# Altium PCB PCB1.PcbDoc (part 1 of 2)
Units mil, origin at the board's own origin, x right, y up, seen from the top; angles counter-clockwise.
Board outline 2130 x 2330 mil, 2 copper layers (Top Layer, Bottom Layer); 110 components, 79 nets, 324 pads, 362 vias.
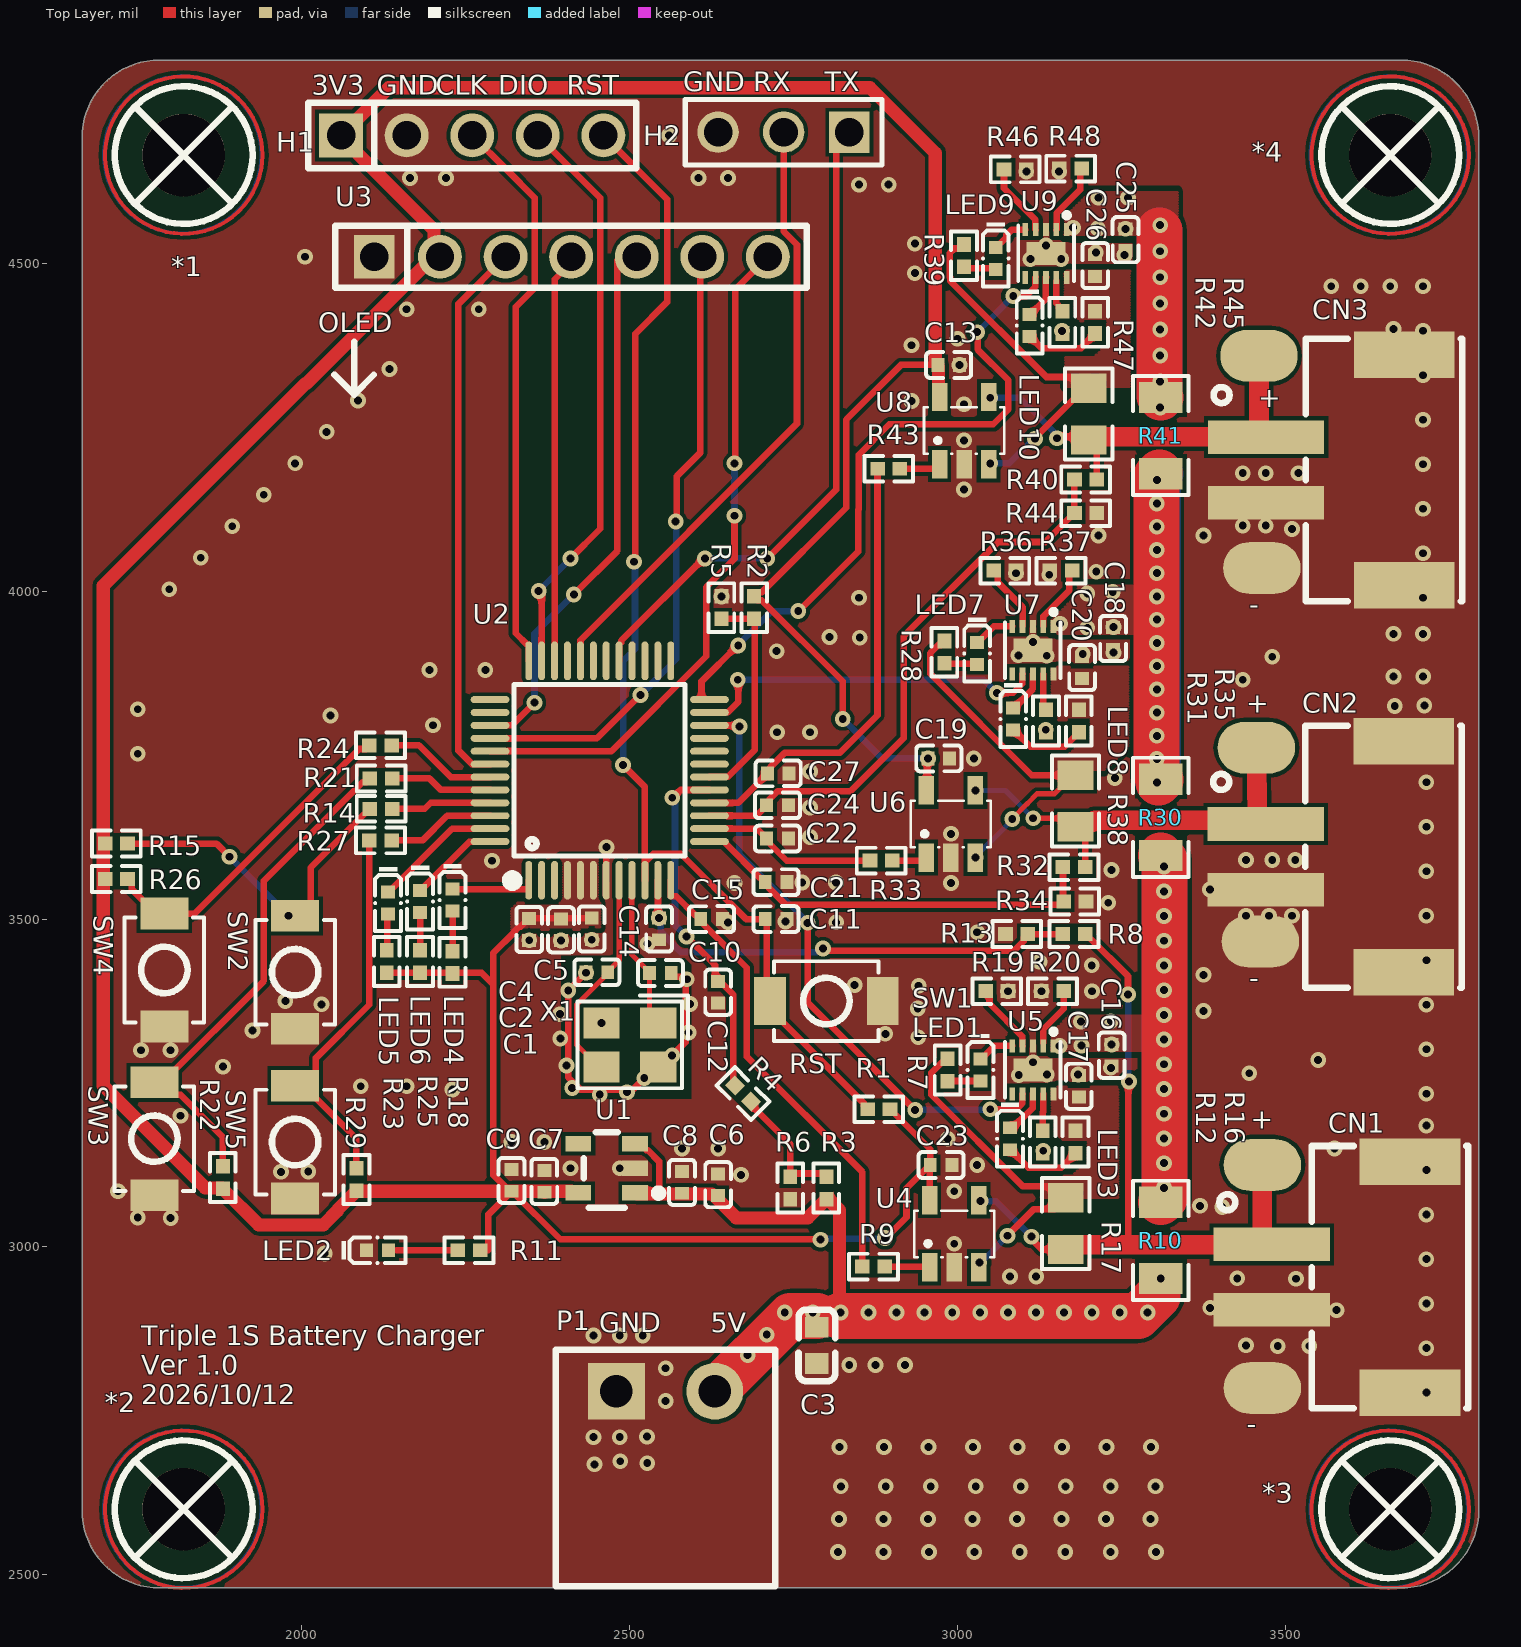
[diagram p0: Top Layer view]
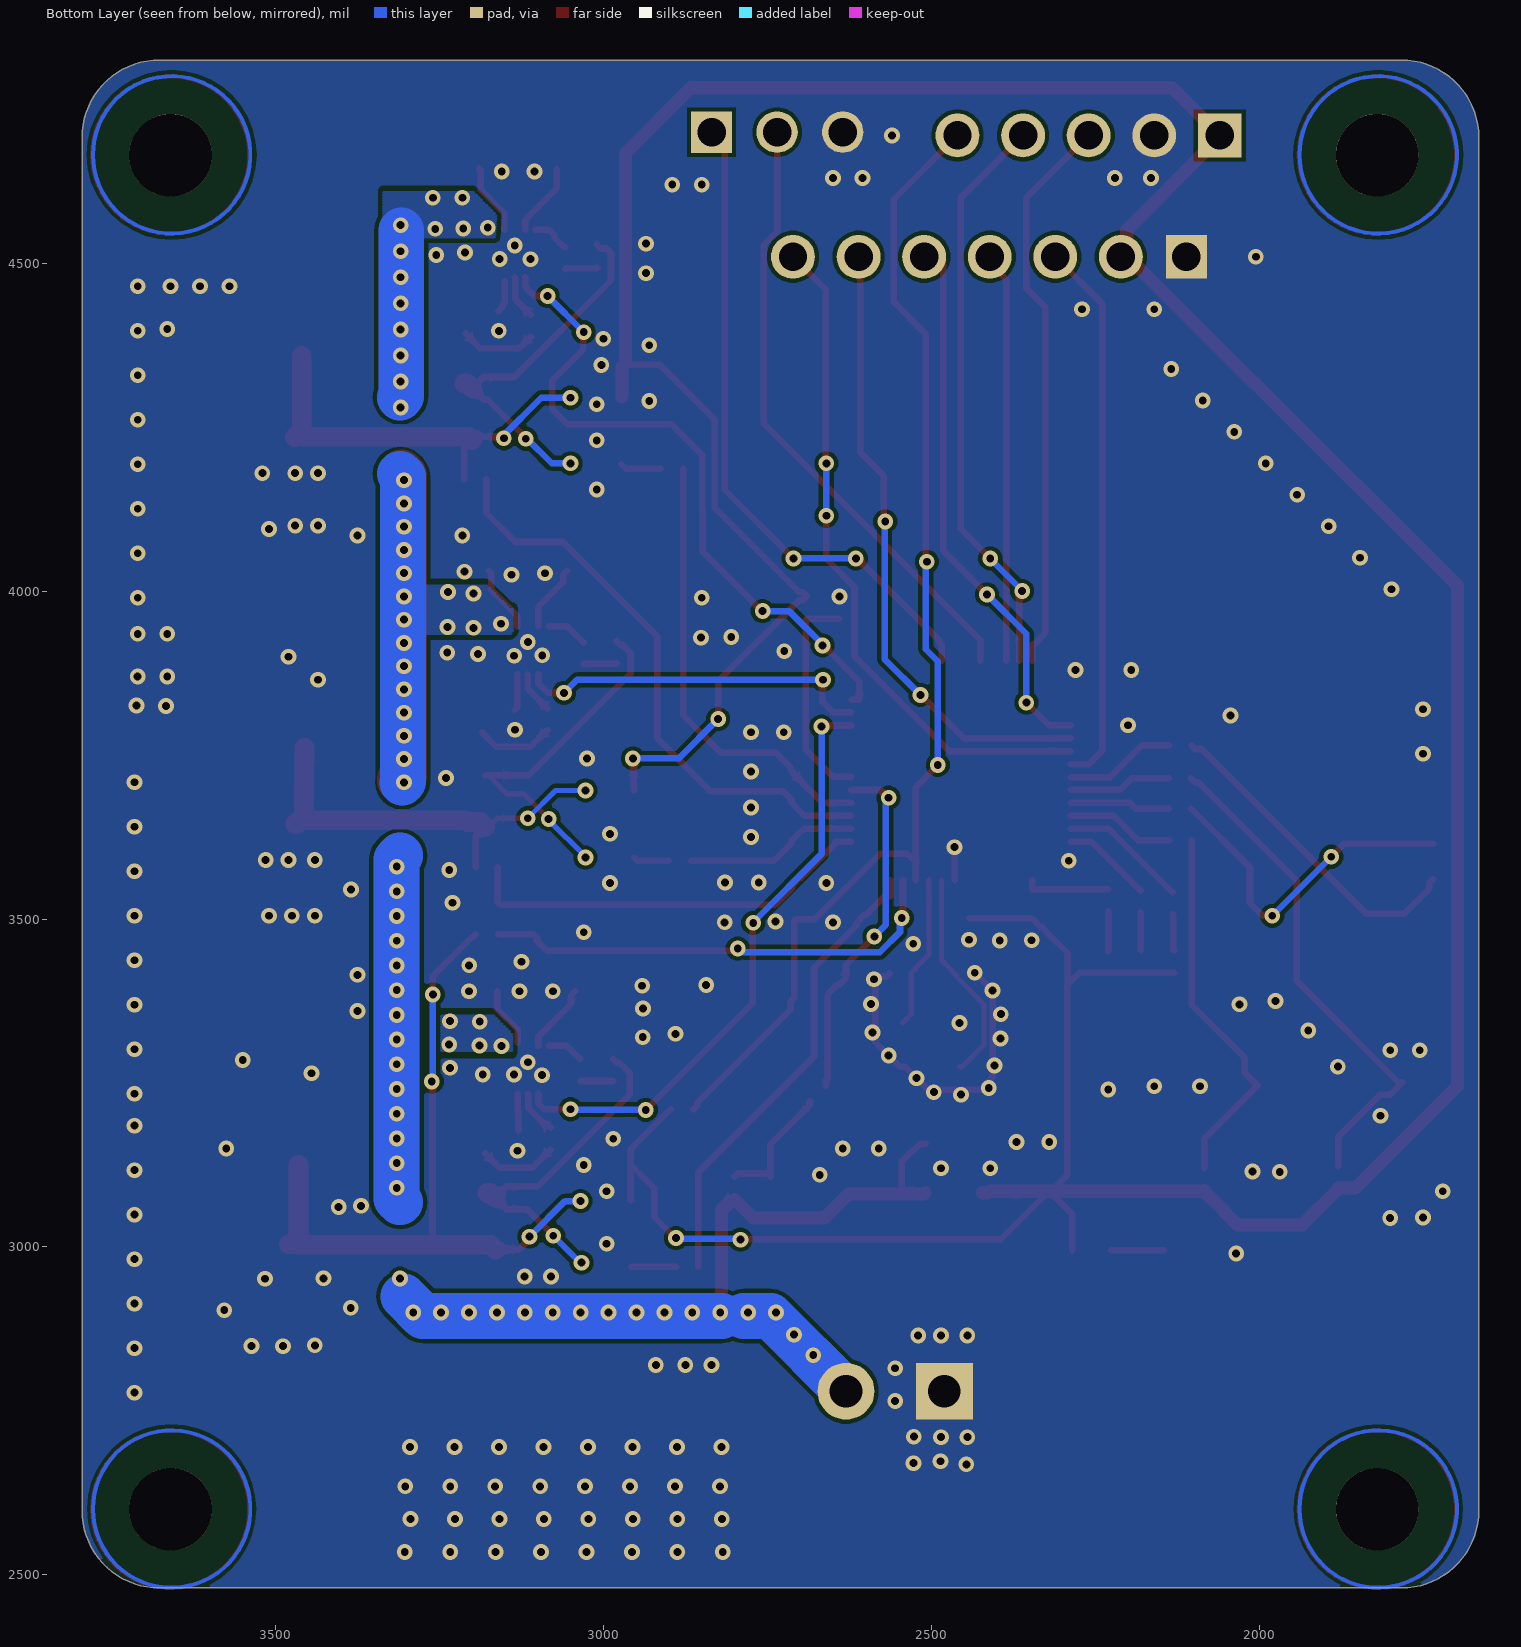
[diagram p1: Bottom Layer view, seen from below]

## Layer stack, top to bottom
Top Solder: solder mask 0.4, Solder Resist, Dk 3.5
Top Layer: signal copper 1.4
Dielectric 1: dielectric 12.6, FR-4, Dk 4.8
Bottom Layer: signal copper 1.4
Bottom Solder: solder mask 0.4, Solder Resist, Dk 3.5

## Board outline
1665,2598.11 1665,4691.89 cw(c1783.11,4691.89) 1783.11,4810 3676.89,4810 cw(c3676.89,4691.89) 3795,4691.89 3795,2598.11 cw(c3676.89,2598.11) 3676.89,2480 1783.11,2480 cw(c1783.11,2598.11)

## Design rules (kind name [scope] priority, off if disabled: settings)
Clearance [All] p1: gap=6 ignorepadtopadclearanceinfootprint=FALSE except(4: Arc-Arc Arc-Track Track-Track; 6.9: Arc-Hole Track-Hole SMDPad-Hole THPad-Hole Via-Hole Fill-Hole Poly-Hole Region-Hole Text-Hole; 10: Fill-Text Poly-Text Region-Text)
ComponentClearance [All] p1: gap=0 collisioncheckmode=3 verticalgap=0 showdistances=FALSE
HoleSize [All] p1: absolutevalues=TRUE maxlimit=130 minlimit=1 maxpercent=80.000 minpercent=20.000
MinimumSolderMaskSliver [All] p1: minsoldermaskwidth=4
PlaneConnect [All] p1: planeconnectstyle=Direct reliefexpansion=20 reliefentries=4 reliefconductorwidth=10 reliefairgap=10
PolygonConnect [All] p1: connectstyle=Direct reliefconductorwidth=10 reliefentries=4 polygonreliefangle="90 Angle" airgapwidth=10
RoutingVias [All] p1: holewidth=28 width=50 viastyle="Through Hole" minholewidth=28 minwidth=50 maxholewidth=28 maxwidth=50
SilkToSilkClearance [All] p1: silktosilkclearance=2
SilkToSolderMaskClearance [IsPad] p1: minsilkscreentomaskgap=2 clearancetoexposedcopper=TRUE
SolderMaskExpansion [All] p1: expansion=0 istentingtop=FALSE
SupplyNets "Schematic Supply Nets_12" [InNet('5V_1')] p1: voltage=0.000
SupplyNets "Schematic Supply Nets_11" [InNet('5V_2')] p2: voltage=0.000
SupplyNets "Schematic Supply Nets_2" [InNet('5V_3')] p3: voltage=0.000
SupplyNets "Schematic Supply Nets_9" [InNet('VBAT3')] p4: voltage=0.000
SupplyNets "Schematic Supply Nets_6" [InNet('VBAT2')] p5: voltage=0.000
SupplyNets "Schematic Supply Nets_10" [InNet('VBAT3_H')] p6: voltage=0.000
SupplyNets "Schematic Supply Nets_7" [InNet('VBAT1_H')] p7: voltage=0.000
SupplyNets "Schematic Supply Nets_5" [InNet('VBAT1')] p8: voltage=0.000
SupplyNets "Schematic Supply Nets_4" [InNet('VBAT2_H')] p9: voltage=0.000
SupplyNets "Schematic Supply Nets_1" [InNet('5V')] p10: voltage=0.000
SupplyNets "Schematic Supply Nets" [InNet('3V3')] p11: voltage=0.000
SupplyNets "Schematic Supply Nets_8" [InNet('GND')] p12: voltage=0.000
Width [All] p1: maxlimit=120 minlimit=6 preferedwidth=10 minimp=50.000000 maximp=50.000000 favimp=50.000000
24 further rules are at their usual default settings.

## Components (designator, comment, footprint, x,y, rotation, side; value= is the part's Value field where it differs from the comment)
*1 "螺丝孔_1" M3螺丝 1820,4665 r0 top
*2 "螺丝孔_1" M3螺丝 1820,2600 r0 top
*3 "螺丝孔_1" M3螺丝 3660,2600 r0 top
*4 "螺丝孔_1" M3螺丝 3660,4665 r0 top
C1 "cc0402krx7r7bb104" C0402 2346.91,3484.19 r270 top value=100nF
C2 "cc0402krx7r7bb104" C0402 2395.45,3483.76 r270 top value=100nF
C3 "hgc0603r5226m160nthj" C0603 2785.56,2849.86 r90 top value=22uF
C4 "cc0402krx7r7bb104" C0402 2442.28,3485.04 r270 top value=100nF
C5 "cc0402jrnpo9bn180" C0402 2450.12,3418.96 r180 top value=18pF
C6 "cga0402x5r105k500gt" C0402 2635,3095 r90 top value=1uF
C7 "cc0402krx7r7bb104" C0402 2370,3100 r90 top value=100nF
C8 "cc0402krx7r7bb104" C0402 2580,3098.46 r90 top value=100nF
C9 "cga0402x5r105k500gt" C0402 2320,3101.54 r90 top value=1uF
C10 "cc0402jrnpo9bn180" C0402 2546.94,3417.73 r180 top value=18pF
C11 "cc0402krx7r7bb104" C0402 2723.36,3500 r180 top value=100nF
C12 "cc0402krx7r7bb104" C0402 2635,3388.46 r90 top value=100nF
C13 "cc0402krx7r7bb104" C0402 2986.54,4345 r180 top value=100nF
C14 "cc0402krx7r7bb104" C0402 2545,3485 r270 top value=100nF
C15 "cc0402krx7r7bb104" C0402 2625,3500 r0 top value=100nF
C16 "cga0402x5r105k500gt" C0402 3235.15,3292.39 r90 top value=1uF
C17 "cga0402x5r105k500gt" C0402 3185,3245 r270 top value=1uF
C18 "cga0402x5r105k500gt" C0402 3237.26,3927.95 r90 top value=1uF
C19 "cc0402krx7r7bb104" C0402 2971.54,3745 r180 top value=100nF
C20 "cga0402x5r105k500gt" C0402 3190,3883.46 r270 top value=1uF
C21 "cc0402krx7r7bb104" C0402 2723.36,3556.33 r0 top value=100nF
C22 "cc0402krx7r7bb104" C0402 2725.49,3622.82 r0 top value=100nF
C23 "cc0402krx7r7bb104" C0402 2975,3125 r180 top value=100nF
C24 "cc0402krx7r7bb104" C0402 2725.49,3673.63 r0 top value=100nF
C25 "cga0402x5r105k500gt" C0402 3256.34,4536 r90 top value=1uF
C26 "cga0402x5r105k500gt" C0402 3210,4496.54 r270 top value=1uF
C27 "cc0402krx7r7bb104" C0402 2726.58,3722.23 r0 top value=100nF
CN1 "2.54-2a-lt" CONN-SMD_2P-P2.54_XH2.54-2AB 3584.68,2954.02 r270 top
CN2 "2.54-2a-lt" CONN-SMD_2P-P2.54_XH2.54-2AB 3575.32,3595.03 r270 top
CN3 "2.54-2a-lt" CONN-SMD_2P-P2.54_XH2.54-2AB 3575.95,4184.87 r270 top
H1 "pz254v-11-05p" HDR-TH_5P-P2.54-V-M 2260,4695 r0 top
H2 "lail-pz2.54-3p-l" HDR-TH_3P-P2.54-V-M-1 2735,4700 r180 top
LED1 "xl-1005ugc_c965793" LED0402-RD_GREEN 3035,3270 r270 top
LED2 "xl-1005ugc_c965793" LED0402-RD_GREEN 2115.51,2994.99 r0 top
LED3 "xl-1005ugc_c965793" LED0402-RD_GREEN 3080,3165 r270 top
LED4 "xl-1005ugc_c965793" LED0402-RD_GREEN 2230,3528.91 r270 top
LED5 "xl-1005ugc_c965793" LED0402-RD_GREEN 2131.7,3524.28 r270 top
LED6 "xl-1005ugc_c965793" LED0402-RD_GREEN 2180.51,3526.83 r270 top
LED7 "xl-1005ugc_c965793" LED0402-RD_GREEN 3030,3905 r270 top
LED8 "xl-1005ugc_c965793" LED0402-RD_GREEN 3085,3805 r270 top
LED9 "xl-1005ugc_c965793" LED0402-RD_GREEN 3058.4,4507.47 r270 top
LED10 "xl-1005ugc_c965793" LED0402-RD_GREEN 3110,4405 r270 top
P1 "wj15edgrc-3.81-02p-14-00a" CONN-TH_2P-P3.81_WJ15EDGRC-3.81-2P 2555,2780 r0 top
R1 "frc0402f1002ts" R0402 2880,3210 r0 top value=10kΩ
R2 "frc0402f1002ts" R0402 2690,3975 r270 top value=10kΩ
R3 "frc0402f1003ts" R0402 2800,3090 r90 top value=100kΩ
R4 "frc0402j102 ts" R0402 2672.88,3233.98 r135 top value=1kΩ
R5 "ncp15xh103f03rc" R0402 2640,3975 r270 top
R6 "0402wgf4702tce" R0402 2745,3090 r90 top value=47kΩ
R7 "frc0402f1501ts" R0402 2985,3270 r90 top value=1.5kΩ
R8 "0402wgf4702tce" R0402 3177.55,3477.15 r180 top value=47kΩ
R9 "frc0402j102 ts" R0402 2872.04,2970 r180 top value=1kΩ
R10 "re1206f1r000" R1206 3310,3010 r270 top value=0Ω
R11 "frc0402j102 ts" R0402 2255,2995 r0 top value=1kΩ
R12 "frc0402f1002ts" R0402 3130,3160 r270 top value=10kΩ
R13 "frc0402f1002ts" R0402 3090.32,3477.15 r180 top value=10kΩ
R14 "0402wgf4700tce" R0402 2121.06,3668.18 r0 top value=470Ω
R15 "rc0402fr-074k7l" R0402 1717.33,3615.14 r0 top value=4.7kΩ
R16 "frc0402f1501ts" R0402 3180,3160 r90 top value=1.5kΩ
R17 "re0805far030" R0805 3165,3035.63 r270 top value=30mΩ
R18 "frc0402j102 ts" R0402 2230,3434.03 r270 top value=1kΩ
R19 "frc0402f2001ts" R0402 3060,3390 r180 top value=2kΩ
R20 "frc0402f5600ts" R0402 3145,3390 r0 top value=560Ω
R21 "0402wgf4700tce" R0402 2121.06,3714.5 r0 top value=470Ω
R22 "rc0402fr-074k7l" R0402 1879.63,3105.92 r90 top value=4.7kΩ
R23 "frc0402j102 ts" R0402 2129.65,3435.23 r270 top value=1kΩ
R24 "0402wgf4700tce" R0402 2120,3765 r0 top value=470Ω
R25 "frc0402j102 ts" R0402 2180.51,3435.23 r270 top value=1kΩ
R26 "rc0402fr-074k7l" R0402 1717.33,3561 r0 top value=4.7kΩ
R27 "0402wgf4700tce" R0402 2120,3620 r0 top value=470Ω
R28 "frc0402f1501ts" R0402 2980,3907.04 r90 top value=1.5kΩ
R29 "rc0402fr-074k7l" R0402 2083.42,3102.77 r90 top value=4.7kΩ
R30 "re1206f1r000" R1206 3310,3655 r270 top value=0Ω
R31 "frc0402f1002ts" R0402 3135,3802.04 r270 top value=10kΩ
R32 "0402wgf4702tce" R0402 3177.55,3579.11 r180 top value=47kΩ
R33 "frc0402j102 ts" R0402 2883.59,3589.12 r180 top value=1kΩ
R34 "frc0402f1002ts" R0402 3178.93,3526.83 r0 top value=10kΩ
R35 "frc0402f1501ts" R0402 3185,3802.04 r90 top value=1.5kΩ
R36 "frc0402f2001ts" R0402 3072.23,4031.28 r180 top value=2kΩ
R37 "frc0402f5600ts" R0402 3157.84,4031.28 r0 top value=560Ω
R38 "re0805far030" R0805 3180,3680 r270 top value=30mΩ
R39 "frc0402f1501ts" R0402 3010,4511.66 r90 top value=1.5kΩ
R40 "0402wgf4702tce" R0402 3195.41,4170.41 r180 top value=47kΩ
R41 "re1206f1r000" R1206 3310,4237.4 r270 top value=0Ω
R42 "frc0402f1002ts" R0402 3160,4410 r270 top value=10kΩ
R43 "frc0402j102 ts" R0402 2895.2,4186.76 r180 top value=1kΩ
R44 "frc0402f1002ts" R0402 3195.41,4119.02 r0 top value=10kΩ
R45 "frc0402f1501ts" R0402 3210,4410 r90 top value=1.5kΩ
R46 "frc0402f2001ts" R0402 3087.94,4643.25 r180 top value=2kΩ
R47 "re0805far030" R0805 3200,4270 r270 top value=30mΩ
R48 "frc0402f5600ts" R0402 3172.5,4644.45 r0 top value=560Ω
SW1 "ts-1088-ar02016" SW-SMD_L3.9-W3.0-P4.45 2800,3375 r180 top
SW2 "ts-1088-ar02016" SW-SMD_L3.9-W3.0-P4.45 1990,3418.96 r90 top
SW3 "ts-1088-ar02016" SW-SMD_L3.9-W3.0-P4.45 1775.37,3165.06 r90 top
SW4 "ts-1088-ar02016" SW-SMD_L3.9-W3.0-P4.45 1790.57,3422.39 r90 top
SW5 "ts-1088-ar02016" SW-SMD_L3.9-W3.0-P4.45 1990,3160 r90 top
U1 "tps7a2033pdbvr" SOT-23-5_L2.9-W1.6-P0.95-LS2.8-BR 2465,3120 r0 top
U2 "stm32g031c8t6" LQFP-48_L7.0-W7.0-P0.50-LS9.0-BL 2454.5,3726.46 r0 top
U3 "kh-2.54fh-1x7p-h8.5" HDR-TH_7P-P2.54-V-F 2410.85,4509.95 r0 top
U4 "ina180a3idbvr" SOT-23-5_L3.0-W1.7-P0.95-LS2.8-BR 2995,3020 r270 top
U5 "bq24040dsqr" WSON-10_L2.0-W2.0-P0.40-BL-EP 3115,3270 r180 top
U6 "ina180a3idbvr" SOT-23-5_L3.0-W1.7-P0.95-LS2.8-BR 2990,3645 r270 top
U7 "bq24040dsqr" WSON-10_L2.0-W2.0-P0.40-BL-EP 3115,3910 r180 top
U8 "ina180a3idbvr" SOT-23-5_L3.0-W1.7-P0.95-LS2.8-BR 3010,4245 r270 top
U9 "bq24040dsqr" WSON-10_L2.0-W2.0-P0.40-BL-EP 3135,4515 r180 top
X1 "x32258mob4si" CRYSTAL-SMD_4P-L3.2-W2.5-BL 2500.36,3308.16 r180 top value=8MHz

## Footprints (in the part's own frame and the unit in brackets; to place one, negate y for a bottom-side part, rotate by r counter-clockwise, add the part's x,y. Pads: shape width x height; smd on the part's side, far side on the other; paste and mask are expansions set on the pad)
C0402 [mm]
  rect 0.5x0.54 smd: 1(-0.42,0) 2(0.42,0)
  silkscreen extent -0.87,-0.5 0.87,0.5
C0603 [mm]
  rect 0.8x0.9 smd: 1(-0.7,0) 2(0.7,0)
  silkscreen extent -1.39,-0.71 1.39,0.71
CONN-SMD_2P-P2.54_XH2.54-2AB [mm]
  rect 1.3x4.5 smd: 1(-1.269,-2.675) 2(1.27,-2.675)
  rect 1.8x3.9 smd: 3(-4.47,2.675) 4(4.47,2.675)
  silkscreen extent -5.08,-4.71 5.08,4.93
CONN-TH_2P-P3.81_WJ15EDGRC-3.81-2P [mm]
  rect 2.2x2.2 hole 1.26: 1(-1.905,0)
  round 2.2 hole 1.26: 2(1.905,0)
  silkscreen extent -4.25,-7.55 4.25,1.6
CRYSTAL-SMD_4P-L3.2-W2.5-BL [mm]
  rect 1.4x1.2 smd: 1(-1.1,-0.85) 2(1.1,-0.85) 3(1.1,0.85) 4(-1.1,0.85)
  silkscreen extent -2.26,-1.91 2.03,1.68
HDR-TH_3P-P2.54-V-M-1 [mm]
  rect 1.575x1.6 hole 1.1 paste-2539.97 mask+0.05: 1(-2.54,0)
  round 1.6 hole 1.1 paste-2539.97 mask+0.05: 2(0,0) 3(2.54,0)
  silkscreen extent -3.81,-1.27 3.81,1.27
HDR-TH_5P-P2.54-V-M [mm]
  rect 1.7x1.7 hole 1.1: 1(-5.08,0)
  round 1.7 hole 1.1: 2(-2.54,0) 3(0,0) 4(2.54,0) 5(5.08,0)
  silkscreen extent -6.35,-1.27 6.35,1.27
HDR-TH_7P-P2.54-V-F [mm]
  rect 1.575x1.7 hole 1.1: 1(-7.62,0)
  round 1.7 hole 1.1: 2(-5.08,0) 3(-2.54,0) 4(0,0) 5(2.54,0) 6(5.08,0) 7(7.62,0)
  silkscreen extent -9.13,-1.2 9.13,1.2
LED0402-RD_GREEN [mm]
  rect 0.5x0.54 smd paste+0 mask+0.051: 1(-0.425,0) 2(0.425,0)
  silkscreen extent -1.39,-0.54 1.09,0.54
LQFP-48_L7.0-W7.0-P0.50-LS9.0-BL [mm]
  oval 0.27x1.5 smd paste+0 mask+0.05: 1(-2.75,-4.25) 2(-2.25,-4.25) 3(-1.75,-4.25) 4(-1.25,-4.25) 5(-0.75,-4.25) 6(-0.25,-4.25) 7(0.25,-4.25) 8(0.75,-4.25) 9(1.25,-4.25) 10(1.75,-4.25) 11(2.25,-4.25) 12(2.75,-4.25) 25(2.75,4.25) 26(2.25,4.25) 27(1.75,4.25) 28(1.25,4.25) 29(0.75,4.25) 30(0.25,4.25) 31(-0.25,4.25) 32(-0.75,4.25) 33(-1.25,4.25) 34(-1.75,4.25) 35(-2.25,4.25) 36(-2.75,4.25)
  oval 1.5x0.27 smd paste+0 mask+0.05: 13(4.25,-2.75) 14(4.25,-2.25) 15(4.25,-1.75) 16(4.25,-1.25) 17(4.25,-0.75) 18(4.25,-0.25) 19(4.25,0.25) 20(4.25,0.75) 21(4.25,1.25) 22(4.25,1.75) 23(4.25,2.25) 24(4.25,2.75) 37(-4.25,2.75) 38(-4.25,2.25) 39(-4.25,1.75) 40(-4.25,1.25) 41(-4.25,0.75) 42(-4.25,0.25) 43(-4.25,-0.25) 44(-4.25,-0.75) 45(-4.25,-1.25) 46(-4.25,-1.75) 47(-4.25,-2.25) 48(-4.25,-2.75)
  silkscreen extent -3.59,-4.46 3.3,3.34
M3螺丝 [mil]
  round 126 hole 126 paste-99999 mask+4: 1(0,0)
  Top Layer circle w6: c0,0 r120
  Bottom Layer circle w6: c-1.69,0.46 r120
  silkscreen extent -105,-105 105,105
R0402 [mm]
  rect 0.566x0.54 smd paste-100 mask+0.051: 1(-0.433,0) 2(0.433,0)
  silkscreen extent -0.94,-0.5 0.94,0.5
R0805 [mil]
  rect 44.59x54.21 smd paste-3937.01 mask+2: 1(-39.37,0) 2(39.37,0)
  silkscreen extent -69,-36 69,36
R1206 [mil]
  rect 47.54x66.97 smd paste-3937.01 mask+2: 1(-58.22,0) 2(58.22,0)
  silkscreen extent -91,-42 91,42
SOT-23-5_L2.9-W1.6-P0.95-LS2.8-BR [mm]
  rect 1x0.6 smd paste+0 mask+0.05: 1(1.1,-0.95) 2(1.1,0) 3(1.1,0.95) 4(-1.1,0.95) 5(-1.1,-0.95)
  silkscreen extent -0.89,-1.52 2.16,1.4
SOT-23-5_L3.0-W1.7-P0.95-LS2.8-BR [mm]
  rect 1.1x0.6 smd: 1(1.3,-0.95) 2(1.3,0) 3(1.3,0.95) 4(-1.3,0.95) 5(-1.3,-0.95)
  silkscreen extent -0.9,-1.55 0.9,1.55
SW-SMD_L3.9-W3.0-P4.45 [mm]
  rect 1.23x1.86 smd: 1(-2.185,0) 2(2.185,0)
  silkscreen extent -2.03,-1.54 2.03,1.54
WSON-10_L2.0-W2.0-P0.40-BL-EP [mm]
  rect 0.224x0.505 smd: 1(-0.8,-0.928) 2(-0.4,-0.928) 3(0,-0.928) 4(0.4,-0.928) 5(0.8,-0.928) 6(0.8,0.928) 7(0.4,0.928) 8(0,0.928) 9(-0.4,0.928) 10(-0.8,0.928)
  rect 1.5x0.9 smd: 11(0,0)
  silkscreen extent -1.08,-1.58 1.08,1.08

## Part data
C1 C2 C4 C7 C8 C11 C12 C13 C14 C15 C19 C21 C22 C23 C24 C27: "容值:100nF;精度:±10%;额定电压:16V;温度系数:X7R;", JLCPCB Part Class="Extended Part", LCSC Part Name="100nF ±10% 16V", Manufacturer=YAGEO(国巨), ManufacturerPart=CC0402KRX7R7BB104, Temperature Coefficient=X7R, Tolerance=±10%, Voltage Rating=16V, AddInBom=yes, ConvertToPcb=yes, Datasheet=https://item.szlcsc.com/datasheet/CC0402KRX7R7BB104/61526.html, FootprintName=C0402, ModelId=36a51122f27c49738f86b3bfa98863e0, ModelName=C0402_L1.0-W0.5-H0.5, ModelTransform=39.37,19.685,0,0,0,0,0,0,0, Supplier=LCSC, Supplier Footprint=0402, SupplierPart=C60474, Symbol=CC0402KRX7R7BB104
C3: "容值:22uF;精度:±20%;额定电压:16V;温度系数:X5R;", JLCPCB Part Class="Extended Part", LCSC Part Name="22uF ±20% 16V", Manufacturer=Chinocera(华瓷), ManufacturerPart=HGC0603R5226M160NTHJ, Temperature Coefficient=X5R, Tolerance=±20%, Voltage Rating=16V, AddInBom=yes, ConvertToPcb=yes, Datasheet=https://item.szlcsc.com/datasheet/HGC0603R5226M160NTHJ/23841133.html, FootprintName=C0603, ModelId=ac125912035d415993ca9572d50418b1, ModelName=C0603_L1.6-W0.8-H0.8, ModelTransform=62.992,31.496,0,0,0,0,0,0,0, Supplier=LCSC, Supplier Footprint=0603, SupplierPart=C22367828, Symbol=HGC0603R5226M160NTHJ
C5 C10: "容值:18pF;精度:±5%;额定电压:50V;温度系数:NP0;", JLCPCB Part Class="Extended Part", LCSC Part Name="18pF ±5% 50V", Manufacturer=YAGEO(国巨), ManufacturerPart=CC0402JRNPO9BN180, Temperature Coefficient=NP0, Tolerance=±5%, Voltage Rating=50V, AddInBom=yes, ConvertToPcb=yes, Datasheet=https://item.szlcsc.com/datasheet/CC0402JRNPO9BN180/107417.html, FootprintName=C0402, ModelId=36a51122f27c49738f86b3bfa98863e0, ModelName=C0402_L1.0-W0.5-H0.5, ModelTransform=39.37,19.685,0,0,0,0,0,0,0, Supplier=LCSC, Supplier Footprint=0402, SupplierPart=C106202, Symbol=CC0402JRNPO9BN180
C6 C9 C16 C17 C18 C20 C25 C26: "容值:1uF;精度:±10%;额定电压:50V;温度系数:X5R;", JLCPCB Part Class="Extended Part", LCSC Part Name="1uF ±10% 50V", Manufacturer=HRE(芯声), ManufacturerPart=CGA0402X5R105K500GT, Temperature Coefficient=X5R, Tolerance=±10%, Voltage Rating=50V, AddInBom=yes, ConvertToPcb=yes, Datasheet=https://item.szlcsc.com/datasheet/CGA0402X5R105K500GT/7062517.html, FootprintName=C0402, ModelId=36a51122f27c49738f86b3bfa98863e0, ModelName=C0402_L1.0-W0.5-H0.5, ModelTransform=39.37,19.685,0,0,0,0,0,0,0, Supplier=LCSC, Supplier Footprint=0402, SupplierPart=C6119811, Symbol=CGA0402X5R105K500GT
CN1 CN2 CN3: "插针结构:1x2P;间距:2.54mm;安装方式:立贴;参考系列:XH;总PIN数:2P;排数:1;每排PIN数:2;行距:-;额定电流:500mA;触头材质:磷铜;触头镀层:锡;工作温度:-25℃~+85℃;", Color=米色, Current Rating=500mA, JLCPCB Part Class="Extended Part", LCSC Part Name="1x2P 间距:2.54mm 立贴 系列:XH", Manufacturer=CAX(创都), ManufacturerPart=2.54-2A-LT, Operating Temperature=-25℃~+85℃, Voltage Rating=50V, AddInBom=yes, Contact Material=磷铜, Contact Plating=锡, ConvertToPcb=yes, Datasheet=https://item.szlcsc.com/datasheet/2.54-2A-LT/766902.html, FootprintName=CONN-SMD_2P-P2.54_XH2.54-2AB, ModelId=d8a33bf5c0154e0995c08ba39c3c8f35, ModelName=CONN-SMD_XH2.54-LS-2P, ModelTransform=393.7,354.33,0,0,0,0,0,9.843,0, Mounting Type=立贴, Number of Pins=2P, Number of PINs Per Row=2, Number of Rows=1, Pins Structure=1x2P, Pitch=2.54mm, Plastic Material=LCP, Reference Series=XH, Row Spacing=-, Supplier=LCSC, Supplier Footprint=SMD,P=2.54mm, SupplierPart=C722695, Symbol=2.54-2A-LT, Y-Width of Bottom Edge on Board=6mm, Z-Height of the Board=7.9mm
H1: "插针结构:1x5P;间距:2.54mm;行距:-;圆针/方针:方针;安装方式:直插;排数:单排;总PIN位数:5P;额定电流:3A;额定电压:250V;配合针长度:6mm;塑高:2.5mm;端接针长度:3mm;触头材质:黄铜;触头镀层:-;工作温度:-40℃~+105℃;颜色:黑色;", Color=黑色, Current Rating=3A, JLCPCB Part Class="Extended Part", LCSC Part Name="1x5P 间距:2.54mm 方针 直插", Manufacturer=XFCN(兴飞), ManufacturerPart=PZ254V-11-05P, Operating Temperature=-40℃~+105℃, Voltage Rating (Max)=250V, AddInBom=yes, Circluar Pins/Square Pins=方针, Contact Material=黄铜, Contact Plating=-, ConvertToPcb=yes, Datasheet=https://item.szlcsc.com/datasheet/PZ254V-11-05P/502960.html, FootprintName=HDR-TH_5P-P2.54-V-M, Insulation Height=2.5mm, Length of End Connection Pin=3mm, Length of Mating Pin=6mm, ModelId=47d466e4a34f4fc5bc626cf773a24dd5, ModelName=HDR-TH_5P-P2.54-M-LI-1X5P, ModelTransform=499.999,100,0,0,0,0,0,0,-118.11, Mounting Type=直插, Number of Pins=5P, Number of Rows=单排, Pin Structure=1x5P, Pitch=2.54mm, Row Spacing=-, Supplier=LCSC, Supplier Footprint=插件,P=2.54mm, SupplierPart=C492404, Symbol=PZ254V-11-05P
H2: "插针结构:1x3P;间距:2.54mm;圆针/方针:方针;排数:单排;总PIN位数:3P;额定电流:3A;额定电压:250V;塑高:2.5mm;端接针长度:3mm;触头材质:黄铜;触头镀层:金;工作温度:-25℃~+80℃;颜色:黑色;", Color=黑色, Current Rating=3A, JLCPCB Part Class="Extended Part", LCSC Part Name="1x3P 间距:2.54mm 方针", Manufacturer=LAILAN(莱联), ManufacturerPart=LAIL-PZ2.54-3P-L, Operating Temperature=-25℃~+80℃, Voltage Rating (Max)=250V, AddInBom=yes, Circluar Pins/Square Pins=方针, Contact Material=黄铜, Contact Plating=金, ConvertToPcb=yes, Datasheet=https://item.szlcsc.com/datasheet/LAIL-PZ2.54-3P-L/58519957.html, FootprintName=HDR-TH_3P-P2.54-V-M-1, Insulation Height=2.5mm, Length of End Connection Pin=3mm, ModelId=94a8ffe137b6410295cb18cd3ffd99db, ModelName=HDR-M-2.54_1x3, ModelTransform=299.9994,100,0,0,0,0,0,0,-118.11, Number of Pins=3P, Number of Rows=单排, Pin Structure=1x3P, Pitch=2.54mm, Supplier=LCSC, Supplier Footprint=插件,P=2.54mm, SupplierPart=C54950604, SymbolName=LAIL-PZ2.54-3P-L
LED1 LED2 LED3 LED4 LED5 LED6 LED7 LED8 LED9 LED10: "灯头类型:1.0mmx0.5mm方形灯头;发光颜色:翠绿色;正向压降(Vf):3V;功率:80mW;正向电流:25mA;波长:516nm~531nm;二极管配置:独立二极管;透镜颜色:无色透明透镜;色温:-;发光强度:249mcd;发光角度:120°;载带方式:正贴;工作温度:-40℃~+85℃;", Color Temperature=-, Forward Current=25mA, Illumination Color=翠绿色, JLCPCB Part Class="Extended Part", LCSC Part Name=0402翠绿贴片式发光二极管, Lens Color=无色透明透镜, Manufacturer=XINGLIGHT(成兴光), ManufacturerPart=XL-1005UGC, Operating Temperature=-40℃~+85℃, Power(Watts)=80mW, Voltage - Forward(Vf)=3V, AddInBom=yes, ConvertToPcb=yes, Datasheet=https://item.szlcsc.com/datasheet/XL-1005UGC/1051402.html, Diode Configuration=独立二极管, FootprintName=LED0402-RD_GREEN, Lamp Holder Type=1.0mmx0.5mm方形灯头, Luminous Intensity=249mcd, ModelId=080bb9bd520f4b34ac21e218e7b036d6, ModelName=LED0402_L1.0-W0.5-H0.2, ModelTransform=40.1574,19.685,0,0,0,0,0,-0.0005,0, Mounting Style=正贴, Peak Wavelength=531nm, Supplier=LCSC, Supplier Footprint=0402, SupplierPart=C965793, Symbol=XL-1005UGC, Viewing Angle=120°, Wavelength - Dominant=516nm~531nm
P1: "连接器类型:板端/插座-闭口;固定方式:无固定装置;结构:1x2P;间距:3.81mm;颜色:绿色;安装方式:弯插;排数:1;每排PIN数:2;额定电流:8A;额定电压:300V;线规 - AWG:-;线规 - 平方毫米:-;工作温度:-40℃~+105℃;", Color=绿色, Current Rating=8A, JLCPCB Part Class="Extended Part", LCSC Part Name="无固定装置 1x2P 3.81mm 排数:1 每排P数:2", Manufacturer=KANGNEX(康奈克斯电气), ManufacturerPart=WJ15EDGRC-3.81-02P-14-00A, Operating Temperature=-40℃~+105℃, Voltage Rating (Max)=300V, AddInBom=yes, Connection Type=-, Connector Type=板端/插座-闭口, ConvertToPcb=yes, Datasheet=https://item.szlcsc.com/datasheet/WJ15EDGRC-3.81-02P-14-00A/8881.html, FootprintName=CONN-TH_2P-P3.81_WJ15EDGRC-3.81-2P, ModelId=816ec8aca6fe4785be70cb4c5121258d, ModelName=CONN-TH_2P_L8.5-W9.2-H7.0-P3.81, ModelTransform=334.645,360.2355,0,0,0,0,0,-118.11,-137.795, Mounting Type=弯插, Number of Pins=2P, Number of PINs Per Row=2, Number of Positions or Pins=1x2P, Number of Rows=1, Outlet Direction (Vertical Basis)=-, Pitch=3.81mm, Supplier=LCSC, Supplier Footprint=弯插,P=3.81mm, SupplierPart=C8387, Symbol=WJ15EDGRC-3.81-2P, Termination Style=无固定装置, Wire Gauge - AWG=-, Wire Gauge - mm2=-
R1 R2 R12 R13 R31 R34 R42 R44: "电阻类型:厚膜电阻;阻值:10kΩ;精度:±1%;功率:62.5mW;工作电压:50V;温度系数:±100ppm/℃;", JLCPCB Part Class="Extended Part", LCSC Part Name="10kΩ ±1% 62.5mW 厚膜电阻", Manufacturer=FOJAN(富捷), ManufacturerPart=FRC0402F1002TS, Operating Temperature=-55℃~+155℃, Power(Watts)=62.5mW, Temperature Coefficient=±100ppm/℃, Tolerance=±1%, Voltage-Supply(Max)=50V, AddInBom=yes, ConvertToPcb=yes, Datasheet=https://item.szlcsc.com/datasheet/FRC0402F1002TS/3180374.html, FootprintName=R0402, ModelId=98c88bc2b9094f218f3a3e30a7012738, ModelName=R0402_L1.0-W0.5-H0.4, ModelTransform=39.37,19.685,0,0,0,0,0,0,0, Supplier=LCSC, Supplier Footprint=0402, SupplierPart=C2906861, Symbol=FRC0402F1002TS, Type=厚膜电阻
R3: "电阻类型:厚膜电阻;阻值:100kΩ;精度:±1%;功率:62.5mW;工作电压:50V;温度系数:±100ppm/℃;", JLCPCB Part Class="Extended Part", LCSC Part Name="100kΩ ±1% 62.5mW 厚膜电阻", Manufacturer=FOJAN(富捷), ManufacturerPart=FRC0402F1003TS, Operating Temperature=-55℃~+155℃, Power(Watts)=62.5mW, Temperature Coefficient=±100ppm/℃, Tolerance=±1%, Voltage-Supply(Max)=50V, AddInBom=yes, ConvertToPcb=yes, Datasheet=https://item.szlcsc.com/datasheet/FRC0402F1003TS/3180372.html, FootprintName=R0402, ModelId=98c88bc2b9094f218f3a3e30a7012738, ModelName=R0402_L1.0-W0.5-H0.4, ModelTransform=39.37,19.685,0,0,0,0,0,0,0, Supplier=LCSC, Supplier Footprint=0402, SupplierPart=C2906859, Symbol=FRC0402F1003TS, Type=厚膜电阻
R4 R9 R11 R18 R23 R25 R33 R43: "电阻类型:厚膜电阻;阻值:1kΩ;精度:±5%;功率:62.5mW;工作电压:50V;温度系数:±100ppm/℃;", JLCPCB Part Class="Extended Part", LCSC Part Name="1kΩ ±5% 62.5mW 厚膜电阻", Manufacturer=FOJAN(富捷), ManufacturerPart="FRC0402J102 TS", Operating Temperature=-55℃~+155℃, Power(Watts)=62.5mW, Temperature Coefficient=±100ppm/℃, Tolerance=±5%, Voltage-Supply(Max)=50V, AddInBom=yes, ConvertToPcb=yes, Datasheet=https://item.szlcsc.com/datasheet/FRC0402J102%2520TS/3180412.html, FootprintName=R0402, ModelId=98c88bc2b9094f218f3a3e30a7012738, ModelName=R0402_L1.0-W0.5-H0.4, ModelTransform=39.37,19.685,0,0,0,0,0,0,0, Supplier=LCSC, Supplier Footprint=0402, SupplierPart=C2906899, Symbol="FRC0402J102 TS", Type=厚膜电阻
R5: "阻值:10kΩ;B值(25℃/50℃):3380K;电阻精度:±1%;功率:100mW;B值精度:±1%;最大稳态电流(25℃):310uA;", B Constant Tolerance=±1%, JLCPCB Part Class="Extended Part", LCSC Part Name="10kΩ 3380K 100mW", Manufacturer=muRata(村田), ManufacturerPart=NCP15XH103F03RC, Operating Temperature=-40℃~+125℃, Power(Watts)=100mW, Resistance @ 25℃=10kΩ, Steady State Current (Max)=310uA, AddInBom=yes, B Constant (25℃/50℃)=3380K, B Constant (25℃/75℃)=-, B Constant (25℃/85℃)=3434K, B Constant (25℃/100℃)=3455K, ConvertToPcb=yes, Datasheet=https://item.szlcsc.com/datasheet/NCP15XH103F03RC/78258.html, Dissipation Factor=1mW/℃, FootprintName=R0402, Length=1mm, ModelId=98c88bc2b9094f218f3a3e30a7012738, ModelName=R0402_L1.0-W0.5-H0.4, ModelTransform=39.37,19.685,0,0,0,0,0,0,0, Resistance Tolerance=±1%, Supplier=LCSC, Supplier Footprint=0402, SupplierPart=C77131, Symbol=NCP15XH103F03RC, Width=0.5mm
R6 R8 R32 R40: "电阻类型:厚膜电阻;阻值:47kΩ;精度:±1%;功率:62.5mW;工作电压:50V;温度系数:±100ppm/℃;", JLCPCB Part Class="Basic Part", LCSC Part Name="厚膜电阻 47kΩ ±1%", Manufacturer=UNI-ROYAL(厚声), ManufacturerPart=0402WGF4702TCE, Operating Temperature=-55℃~+155℃, Power(Watts)=62.5mW, Temperature Coefficient=±100ppm/℃, Tolerance=±1%, Voltage-Supply(Max)=50V, AddInBom=yes, ConvertToPcb=yes, Datasheet=https://item.szlcsc.com/datasheet/0402WGF4702TCE/26535.html, FootprintName=R0402, ModelId=98c88bc2b9094f218f3a3e30a7012738, ModelName=R0402_L1.0-W0.5-H0.4, ModelTransform=39.37,19.685,0,0,0,0,0,0,0, Supplier=LCSC, Supplier Footprint=0402, SupplierPart=C25792, Symbol=0402WGF4702TCE, Type=厚膜电阻
R7 R16 R28 R35 R39 R45: "电阻类型:厚膜电阻;阻值:1.5kΩ;精度:±1%;功率:62.5mW;工作电压:50V;温度系数:±100ppm/℃;", JLCPCB Part Class="Extended Part", LCSC Part Name="1.5kΩ ±1% 62.5mW 厚膜电阻", Manufacturer=FOJAN(富捷), ManufacturerPart=FRC0402F1501TS, Operating Temperature=-55℃~+155℃, Power(Watts)=62.5mW, Temperature Coefficient=±100ppm/℃, Tolerance=±1%, Voltage-Supply(Max)=50V, AddInBom=yes, ConvertToPcb=yes, Datasheet=https://item.szlcsc.com/datasheet/FRC0402F1501TS/3279176.html, FootprintName=R0402, ModelId=98c88bc2b9094f218f3a3e30a7012738, ModelName=R0402_L1.0-W0.5-H0.4, ModelTransform=39.37,19.685,0,0,0,0,0,0,0, Supplier=LCSC, Supplier Footprint=0402, SupplierPart=C2933074, Symbol=FRC0402F1501TS, Type=厚膜电阻
R10 R30 R41: "电阻类型:采样电阻；合金电阻;阻值:0Ω;精度:±1%;功率:1W;安装方式:贴片;", JLCPCB Part Class="Extended Part", LCSC Part Name="0Ω 1W 1206 ±1%", Manufacturer=JIERR(捷而瑞), ManufacturerPart=RE1206F1R000, Power(Watts)=1W, Tolerance=±1%, AddInBom=yes, ConvertToPcb=yes, Datasheet=https://item.szlcsc.com/datasheet/RE1206F1R000/49133304.html, FootprintName=R1206, ModelId=89a1f13db2384da588040e0b3c55bf66, ModelName=R1206_L3.2-W1.6-H0.6, ModelTransform=125.984,62.992,0,0,0,0,0,0,0, Mounting Type=贴片, Supplier=LCSC, Supplier Footprint=1206, SupplierPart=C46961765, Symbol=RE1206F1R000, Type=采样电阻；合金电阻
R14 R21 R24 R27: "电阻类型:厚膜电阻;阻值:470Ω;精度:±1%;功率:62.5mW;工作电压:50V;温度系数:±100ppm/℃;", JLCPCB Part Class="Basic Part", LCSC Part Name="厚膜电阻 470Ω ±1%", Manufacturer=UNI-ROYAL(厚声), ManufacturerPart=0402WGF4700TCE, Operating Temperature=-55℃~+155℃, Power(Watts)=62.5mW, Temperature Coefficient=±100ppm/℃, Tolerance=±1%, Voltage-Supply(Max)=50V, AddInBom=yes, ConvertToPcb=yes, Datasheet=https://item.szlcsc.com/datasheet/0402WGF4700TCE/25860.html, FootprintName=R0402, ModelId=98c88bc2b9094f218f3a3e30a7012738, ModelName=R0402_L1.0-W0.5-H0.4, ModelTransform=39.37,19.685,0,0,0,0,0,0,0, Supplier=LCSC, Supplier Footprint=0402, SupplierPart=C25117, Symbol=0402WGF4700TCE, Type=厚膜电阻
R15 R22 R26 R29: "电阻类型:厚膜电阻;阻值:4.7kΩ;精度:±1%;功率:62.5mW;工作电压:50V;温度系数:±100ppm/℃;", JLCPCB Part Class="Extended Part", LCSC Part Name="厚膜电阻 4.7kΩ ±1% 62.5mW", Manufacturer=YAGEO(国巨), ManufacturerPart=RC0402FR-074K7L, Operating Temperature=-55℃~+155℃, Power(Watts)=62.5mW, Temperature Coefficient=±100ppm/℃, Tolerance=±1%, Voltage-Supply(Max)=50V, AddInBom=yes, ConvertToPcb=yes, Datasheet=https://item.szlcsc.com/datasheet/RC0402FR-074K7L/107086.html, FootprintName=R0402, ModelId=98c88bc2b9094f218f3a3e30a7012738, ModelName=R0402_L1.0-W0.5-H0.4, ModelTransform=39.37,19.685,0,0,0,0,0,0,0, Supplier=LCSC, Supplier Footprint=0402, SupplierPart=C105871, Symbol=RC0402FR-074K7L, Type=厚膜电阻
R17 R38 R47: "电阻类型:合金电阻;阻值:30mΩ;精度:±1%;功率:500mW;温度系数:±50ppm/℃;安装方式:贴片;", JLCPCB Part Class="Extended Part", LCSC Part Name="30mΩ 0.5W 0805 ±1%", Manufacturer=JIERR(捷而瑞), ManufacturerPart=RE0805FAR030, Power(Watts)=500mW, Temperature Coefficient=±50ppm/℃, Tolerance=±1%, AddInBom=yes, ConvertToPcb=yes, Datasheet=https://item.szlcsc.com/datasheet/RE0805FAR030/54649547.html, FootprintName=R0805, ModelId=37a81e68749a4138bd2dfa6897b24b85, ModelName=R0805_L2.0-W1.3-H0.6, ModelTransform=78.74,51.181,0,0,0,0,0,-0.0005,0, Mounting Type=贴片, Supplier=LCSC, Supplier Footprint=0805, SupplierPart=C51934135, Symbol=RE0805FAR030, Type=合金电阻
R19 R36 R46: "电阻类型:厚膜电阻;阻值:2kΩ;精度:±1%;功率:62.5mW;工作电压:50V;温度系数:±100ppm/℃;", JLCPCB Part Class="Extended Part", LCSC Part Name="2kΩ ±1% 62.5mW 厚膜电阻", Manufacturer=FOJAN(富捷), ManufacturerPart=FRC0402F2001TS, Operating Temperature=-55℃~+155℃, Power(Watts)=62.5mW, Temperature Coefficient=±100ppm/℃, Tolerance=±1%, Voltage-Supply(Max)=50V, AddInBom=yes, ConvertToPcb=yes, Datasheet=https://item.szlcsc.com/datasheet/FRC0402F2001TS/3186279.html, FootprintName=R0402, ModelId=98c88bc2b9094f218f3a3e30a7012738, ModelName=R0402_L1.0-W0.5-H0.4, ModelTransform=39.37,19.685,0,0,0,0,0,0,0, Supplier=LCSC, Supplier Footprint=0402, SupplierPart=C2909344, Symbol=FRC0402F2001TS, Type=厚膜电阻
R20 R37 R48: "电阻类型:厚膜电阻;阻值:560Ω;精度:±1%;功率:62.5mW;工作电压:50V;温度系数:±100ppm/℃;", JLCPCB Part Class="Extended Part", LCSC Part Name="560Ω ±1% 62.5mW 厚膜电阻", Manufacturer=FOJAN(富捷), ManufacturerPart=FRC0402F5600TS, Operating Temperature=-55℃~+155℃, Power(Watts)=62.5mW, Temperature Coefficient=±100ppm/℃, Tolerance=±1%, Voltage-Supply(Max)=50V, AddInBom=yes, ConvertToPcb=yes, Datasheet=https://item.szlcsc.com/datasheet/FRC0402F5600TS/3186305.html, FootprintName=R0402, ModelId=98c88bc2b9094f218f3a3e30a7012738, ModelName=R0402_L1.0-W0.5-H0.4, ModelTransform=39.37,19.685,0,0,0,0,0,0,0, Supplier=LCSC, Supplier Footprint=0402, SupplierPart=C2909370, Symbol=FRC0402F5600TS, Type=厚膜电阻
SW1 SW2 SW3 SW4 SW5: "电路结构:单刀单掷;按钮形状:圆形按钮;作用力:1.6N;安装方式:立贴;开关长度:3.9mm;开关宽度:3mm;开关高度:2mm;带支架:不带支架;触点电流:50mA;额定电压:12V;带灯:-;工作寿命:10万次;", Actuator/Cap Color=黑色, Contact Current=50mA, IP Rating=-, JLCPCB Part Class="Basic Part", LCSC Part Name="3.9*3*2mm 立贴 轻触开关", Manufacturer=XUNPU(讯普), ManufacturerPart=TS-1088-AR02016, Operating Force=1.6N, Operating Temperature=-30℃~+80℃, Voltage Rating=12V, Actuator Style=圆形按钮, AddInBom=yes, Circuit=单刀单掷, ConvertToPcb=yes, Datasheet=https://item.szlcsc.com/datasheet/TS-1088-AR02016/763484.html, FootprintName=SW-SMD_L3.9-W3.0-P4.45, Length=3.9mm, Life=10万次, ModelId=b26698b69f274ffabef8a26c7d0e5dd1, ModelName=SW-SMD_L3.9-W2.9-H2.0-LS4.8, ModelTransform=188.976,114.174,0,0,0,0,0,0,0, Mounting Type=立贴, Supplier=LCSC, Supplier Footprint=SMD,4x3mm, SupplierPart=C720477, Switch Height=2mm, Symbol=TS-1088-AR02016, Termination Style=SMD接片, Width=3mm, with Bracket=不带支架, With Lamp=-
U1: "输出类型:固定;最大输入电压:6V;输出电压:3.3V;输出电流:300mA;输出极性:正极;", Dropout Voltage=140mV@(300mA), JLCPCB Part Class="Extended Part", LCSC Part Name="具有高 PSRR 的 300mA、超低噪声、低 IQ、低压降 (LDO) 线性稳压器", Manufacturer=TI(德州仪器), ManufacturerPart=TPS7A2033PDBVR, Maximum Input Voltage=6V, Operating Temperature=-40℃~+125℃@(Tj), Output Current=300mA, Output Voltage=3.3V, standby current=15uA, AddInBom=yes, ConvertToPcb=yes, Datasheet=https://www.ti.com/cn/lit/gpn/tps7a20, Feature=防静电保护；软启动；浪涌保护；低ESR；热保护(TSD)；欠压闭锁；过流保护(OCP)；带使能；防倒灌, FootprintName=SOT-23-5_L2.9-W1.6-P0.95-LS2.8-BR, ModelId=7ba65df16e7b4570af156e925f9c37fe, ModelName=SOT-23-5_L2.9-W1.6-P0.95-LS2.8-BR, ModelTransform=114.173,114.173,0,90,0,0,0,0,0, Number of Outputs=1, Output Polarity=正极, Output Type=固定, Supplier=LCSC, Supplier Footprint=SOT-23-5, SupplierPart=C2862740, Symbol=TPS7A2033PDBVR
U2: "CPU内核:ARM Cortex-M0+;CPU最大主频:64MHz;CPU位数:32 Bit;", JLCPCB Part Class="Extended Part", LCSC Part Name="主流Arm Cortex-M0+ MCU，具有64 KB Flash存储器、8 KB RAM、64 MHz CPU、2x USART、定时器、ADC和通信接口，1.7-3.6V", Manufacturer=ST(意法半导体), ManufacturerPart=STM32G031C8T6, Operating Temperature=-40℃~+85℃, Voltage - Supply=1.7V~3.6V, ADC (Bit)=12bit, AddInBom=yes, ConvertToPcb=yes, Core Size="32 Bit", CPU Core="ARM Cortex-M0+", CPU Maximum Speed=64MHz, Datasheet=https://item.szlcsc.com/datasheet/STM32G031C8T6/428993.html, EEPROM=-, FootprintName=LQFP-48_L7.0-W7.0-P0.50-LS9.0-BL, ModelId=093be70396ff421eb2cdb946d5311efc, ModelName=LQFP-48_L7.0-W7.0-H1.4-LS9.0-P0.50, ModelTransform=354.331,354.331,0,0,0,0,0,0,0, Number of I/O=44, Oscillator Type=内置+外置, Program Memory Type=FLASH, Program Storage Size=64KB, RAM Size=8KB, Supplier=LCSC, Supplier Footprint=LQFP-48(7x7), SupplierPart=C432205, Symbol=STM32G031C8T6
U3: "插孔结构:1x7P;间距:2.54mm;行距:-;圆孔/方孔:方孔;安装方式:直插;排数:单排;总孔位数:7P;额定电流:3A;额定电压:-;插孔方向:顶部;塑高:8.5mm;工作温度:-40℃~+105℃;", Current Rating=3A, JLCPCB Part Class="Extended Part", LCSC Part Name="间距:2.54mm 1x7P 直插", Manufacturer=kinghelm(金航标), ManufacturerPart=KH-2.54FH-1X7P-H8.5, Operating Temperature=-40℃~+105℃, Voltage Rating (Max)=-, AddInBom=yes, Circular Hole / Square Hole=方孔, ConvertToPcb=yes, Datasheet=https://item.szlcsc.com/datasheet/KH-2.54FH-1X7P-H8.5/3278193.html, FootprintName=HDR-TH_7P-P2.54-V-F, Holes Direction=顶部, Holes Structure=1x7P, Insulation Height=8.5mm, ModelId=4c31987253bc43b9b52c17be2a6d3f91, ModelName=HDR-TH_7P-P2.54-F-LI-1X7P, ModelTransform=715.7466,94.488,0,0,0,0,0,0,-118.11, Mounting Type=直插, Number of Positions=7P, Number of Rows=单排, Pitch=2.54mm, Row Spacing=-, Supplier=LCSC, Supplier Footprint=插件,P=2.54mm, SupplierPart=C2932672, Symbol=KH-2.54FH-1X7P-H8.5
U4 U6 U8: "放大器数:1;共模电压:-200mV~26V;增益:100V/V;带宽(-3db):150kHz;", Differential Voltage=±26V, Ib - Input Bias Current=100nA, Input Offset Voltage Drift(Vos TC)=1uV/℃, JLCPCB Part Class="Extended Part", LCSC Part Name=高低侧电压输出电流检测放大器, Manufacturer=TI(德州仪器), ManufacturerPart=INA180A3IDBVR, Operating Temperature=-40℃~+125℃, Output Current=8mA, Quiescent Current=197uA, Vcm - Common Mode Voltage=-200mV~26V, Vos - Input Offset Voltage=25uV, AddInBom=yes, Bandwidth=150kHz, Common Mode Rejection Ratio (CMRR)=100dB, ConvertToPcb=yes, Datasheet=https://www.ti.com/cn/lit/ds/symlink/ina180.pdf, Dual Supply=-, Features=模拟输出接口；高边检测；低边检测, FootprintName=SOT-23-5_L3.0-W1.7-P0.95-LS2.8-BR, Gain=100V/V, ModelId=0a2a1b8f50944f73965918ad6e5fe167, ModelName=SOT-23-5_L2.9-W1.6-H1.1-LS2.8-P0.95, ModelTransform=114.173,109.636,0,180,0,0,0,0,0, Noise density(eN)=40nV/√Hz@1kHz, number of channels=1, Single Supply=2.7V~5.5V, Slew Rate=2V/us, Supplier=LCSC, Supplier Footprint=SOT-23-5, SupplierPart=C122882, Symbol=INA180A3IDBVR
U5 U7 U9: "工作电压:3.5V~28V;最大充电电流:1A;电池类型:锂电池;电池节数:1;", Balance Current=-, Battery Temperature Detection=支持, Charge Current - Max=1A, Charging Saturation Voltage=4.2V, End-Off Voltage=800mV, JLCPCB Part Class="Extended Part", LCSC Part Name=1A单输入单节锂离子和锂聚合物电池充电器, Manufacturer=TI(德州仪器), ManufacturerPart=BQ24040DSQR, Operating Temperature=0℃~+125℃, Supply Current (Iq)=1mA, Voltage - Supply=3.5V~28V, 0V Battery Charge=支持, AddInBom=yes, ConvertToPcb=yes, Datasheet=https://www.ti.com/cn/lit/ds/symlink/bq24040.pdf, Features=过流保护；恒压充电；恒流充电；自动再充电；充电终止；可编程充电电流；过压保护；欠压锁定；涓流充电；短路保护, FootprintName=WSON-10_L2.0-W2.0-P0.40-BL-EP, Interface=-, ModelId=0e1275d2e7d54e69a402a354e9203fe9, ModelName=WSON-10_L2.0-W2.0-H0.8-P0.40, ModelTransform=78.74,79.527,0,0,0,0,0,0,0, Number of Cells=1, Supplier=LCSC, Supplier Footprint=WSON-10-EP(2x2), SupplierPart=C81080, Symbol=BQ24040DSQR, The Chip Type=充电芯片, Type of Battery=锂电池
X1: "晶振类型:贴片晶振;频率:8MHz;常温频差:±10ppm;负载电容:12pF;频率稳定度:±20ppm;", Equivalent Series Resistance(ESR)=180Ω, Frequency Stability=±20ppm, JLCPCB Part Class="Extended Part", LCSC Part Name="YSX321SL 8MHZ 4P 3225 12PF ±10PPM -40~85℃ (±20PPM)", Load Capacitance=12pF, Manufacturer=YXC(扬兴晶振), ManufacturerPart=X32258MOB4SI, Normal temperature Frequency Tolerance=±10ppm, Operating Temperature=-40℃~+85℃, AddInBom=yes, ConvertToPcb=yes, Datasheet=https://item.szlcsc.com/datasheet/X32258MOB4SI/2777872.html, FootprintName=CRYSTAL-SMD_4P-L3.2-W2.5-BL, ModelId=ff2dfd5650294453a14147960efe1838, ModelName=CRYSTAL-SMD_4P-L3.2-W2.5-BL, ModelTransform=125.984,98.425,0,0,0,0,0,0,0, Supplier=LCSC, Supplier Footprint=SMD3225-4P, SupplierPart=C2682775, Symbol=X32258MOB4SI, Type=贴片晶振

## Free pads (board coordinates)
  oval 118.11x78.74 smd: 2(3455.86,3761.23) 2(3459.81,4359.02) 2(3462,3465.84) 2(3464.28,4035.33) 2(3465,2785) 2(3465,3125)

## Via types
v1: diameter 24, hole 12, Top Layer to Bottom Layer, tented both sides, 362 vias

## Nets (pads, with @x,y where several pads share a name; then routed paths per layer and width w, separated by ;. In a path a pad name is that pad's centre, name@x,y a point inside that pad or via, vN(x,y) a via of type N, cw(c..) or ccw(c..) an arc to the next point about the centre after c; other vN are vias at no path point)
3V3: C1.1 C2.1 C4.1 C7.1 C9.1 C13.2 C19.2 C23.2 H1.1 R1.2 R2.1 R11.2 R15.1 R18.2 R22.1 R23.2 R25.2 R26.1 R29.1 U1.5 U2.4 U2.5 U2.6 U3.2 U4.5 U6.5 U8.5 | length 6606.5
  Top Layer w10: R23.2@2129.65,3418.19 R25.2@2180.51,3418.19 2230,3418.19 2274.13,3418.19 2292.32,3400 2292.32,3109.73 2312.21,3089.84 C9.1@2314.37,3089.84 ; 2284.66,2995 2284.66,3049.66 2314.37,3079.37 C9.1@2314.37,3080.16 ; 2291.91,3400.42 2291.91,3447.74 2325.28,3481.12 2325.28,3482.05 2331.73,3488.49 2333.89,3488.49 2346.13,3500.73 C1.1@2346.91,3500.73 2347.34,3501.16 C2.1@2395.45,3501.16 ; C9.1@2315.71,3081.5 2319.21,3085 C9.1@2320,3085 ; C9.1@2320.79,3085 2394.18,3011.61 2784.58,3011.61 2787.72,3008.47 2787.72,3005.93 v1@2797.22,3015.43 ; C2.1@2395.45,3500.3 C2.1@2395.45,3501.16 ; C4.1@2442.28,3501.58 2441.85,3501.16 C2.1@2395.45,3501.16 ; R2.1@2690,3992.04 2690,3991.53 2695.63,3985.91 2701.66,3985.91 2825,3862.57 v1(2825,3805) ; R2.1@2690,3992.55 2695.63,3998.18 2701.28,3998.18 2830.46,4127.35 2830.46,4261.77 2913.69,4345 C13.2@2970,4345 ; v1@2889.42,3012.38 2922.28,3045.23 2922.28,3089.56 2952.09,3119.37 2953.62,3119.37 2957.72,3123.47 C23.2@2957.72,3125 ; R1.2@2897.55,3210 2958.46,3149.09 C23.2@2958.46,3125 2958.03,3124.57 2958.03,3071.62 U4.5@2957.6,3071.19 ; U6.5@2952.6,3696.19 2953.8,3697.39 2953.8,3743.8 v1(2955,3745)
  Top Layer w20: R22.1@1879.63,3088.38 1934.24,3033.77 2033.24,3033.77 2054.51,3055.03 2054.51,3056.31 2083.42,3085.23 R29.1@2083.42,3085.73 ; R22.1@1879.63,3088.88 1879.63,3089.39 1879,3090.01 1852.98,3090.01 1697.37,3245.63 1697.37,3561 1697.37,3615.14 1697.37,4008.35 2005.61,4316.59 2006.99,4316.59 2200.35,4509.95 U3.2@2210.85,4509.95 2201.87,4518.93 2201.87,4550.69 2083.46,4669.09 2083.46,4671.54 H1.1@2060,4695 2132.77,4767.77 2866.64,4767.77 2966.17,4668.24 C13.2@2966.17,4349.34 ; R29.1@2083.42,3085.63 2084.05,3085 C9.1@2320,3085 ; C9.1@2320.79,3085 C7.1@2370,3085 ; C7.1@2370,3083.46 C7.1@2370,3085 ; U1.5@2421.69,3082.59 2413.81,3082.59 2411.41,3085 C7.1@2370,3085 ; C13.2@2970,4345 2971.3,4343.7 2971.3,4297.48 U8.5@2972.6,4296.18
  Bottom Layer w10: v1@2790,3012.75 v1@2889.81,3012.75 ; v1(2825,3805) 2885,3745 v1(2955,3745)
  other v1: 2791.05,3011.2 2889.41,3013.52
5V: C3.2 C6.1 C8.1 P1.2 R3.1 R10.2 U1.1 U1.3 | length 2004.5
  Top Layer w10: U1.3@2508.31,3157.4 2516.18,3157.4 2525.77,3147.81 2527.55,3147.81 2545,3130.35 2545,3080.7 ; R3.1@2800,3072.45 2805.63,3066.82 R3.1@2809.22,3066.82
  Top Layer w20: U1.1@2509.47,3082.6 2511.28,3080.79 2527.47,3080.79 2527.57,3080.7 2545,3080.7 C8.1@2580,3080.7 ; C8.1@2580.91,3081.01 2625.9,3081.01 2662.58,3044.33 2771.88,3044.33 R3.1@2800,3072.45 ; R3.1@2809.22,3066.82 2819.85,3056.19 v1@2819.85,2894.6
  Top Layer w70: P1.2@2630,2779.6 2745,2894.6 v1@2785.56,2894.6 ; v1@2819.85,2894.6 3275,2894.6 3305,2924.6
  Bottom Layer w70: P1.2@2630,2779.6 2745,2894.6 v1@2785.56,2894.6 ; v1@2819.85,2894.6 3275,2894.6 3305,2924.6
  other v1: 2680,2835 2709.13,2866.3 2736.67,2900 2779.23,2900 2821.8,2900 2864.36,2900 2906.93,2900 2949.49,2900 2992.05,2900 3034.62,2900 3077.18,2900 3119.74,2900 3162.31,2900 3204.87,2900 3247.44,2900 3290,2900 3310,2951.78
5V_1: C16.2 R10.1 R30.2 U5.1 | length 1143.1
  Top Layer w30: 3296.31,3305 v1@3315.63,3285.68
  Top Layer w70: R10.1@3310,3068.22 3315.63,3073.85 3315.63,3127.82 3315.63,3165.5 3315.63,3203.19 3315.63,3240.87 3315.63,3285.68 3315.63,3308.93 v1@3315.63,3353.91 ; R30.2@3310,3596.78 3315.63,3591.15 3315.63,3542.32 3315.63,3504.64 3315.63,3466.95 3315.63,3429.27 3315.63,3391.59 v1@3315.63,3353.91 ; v1@3315.63,3304.54 v1@3315.63,3353.91
  Bottom Layer w70: 3310,3068.22 3315.63,3073.85 3315.63,3591.15 3310,3596.78
  other v1: 3315,3090.14 3315,3127.82 3315,3165.5 3315,3203.19 3315,3240.87 3315,3278.55 3155.45,3306.38 3189.05,3307.29 3235.15,3308.93 3315,3316.23 3188.44,3343.64 3233.88,3344.33 3315,3353.91 3315,3391.59 3315,3429.27 3315,3466.95 3315,3504.64 3315,3542.32 3315,3580
5V_2: C18.2 R30.1 R41.2 U7.1 | length 951.1
  Top Layer w70: R30.1@3306.76,3708.5 3310,3711.74 R30.1@3310,3713.22 3303.7,3719.52 3303.7,3810 3303.7,3848.74 3303.7,3915 3303.7,3944.49 3303.7,3951.53 3303.7,3992.09 3303.7,4027.54 3303.7,4062.99 3303.7,4098.44 3303.7,4133.89 3303.7,4176.32 R41.2@3308.14,4180.76
  Bottom Layer w70: v1@3306.76,3708.5 3305.56,3709.7 3305.56,3810 3305.56,3882.49 3305.56,3948.11 3305.56,3985 3305.56,4054.35 3305.56,4091.85 3305.56,4129.34 3305.56,4174.75 v1@3310,4179.18
  other v1: 3304.04,3708.5 3304.04,3743.95 3304.04,3779.4 3304.04,3814.85 3304.04,3850.3 3304.04,3885.75 3304.04,3921.2 3198.01,3944.14 3237.77,3945.47 3156.27,3950.44 3304.04,3956.64 3304.04,3992.09 3198.01,3996.49 3236.77,3998.81 3304.04,4027.54 3304.04,4062.99 3304.04,4098.44 3304.04,4133.89 3304.04,4169.34